# Altium PCB EMG-Arm-ELEC-V1.0.PcbDoc (part 1 of 5)
Units mil, origin at the board's own origin, x right, y up, seen from the top; angles counter-clockwise.
Board outline 8303.83 x 7532.25 mil, 2 copper layers (Top Layer, Bottom Layer), stack 3.556 mil thick; 303 components, 183 nets, 804 pads, 233 vias.
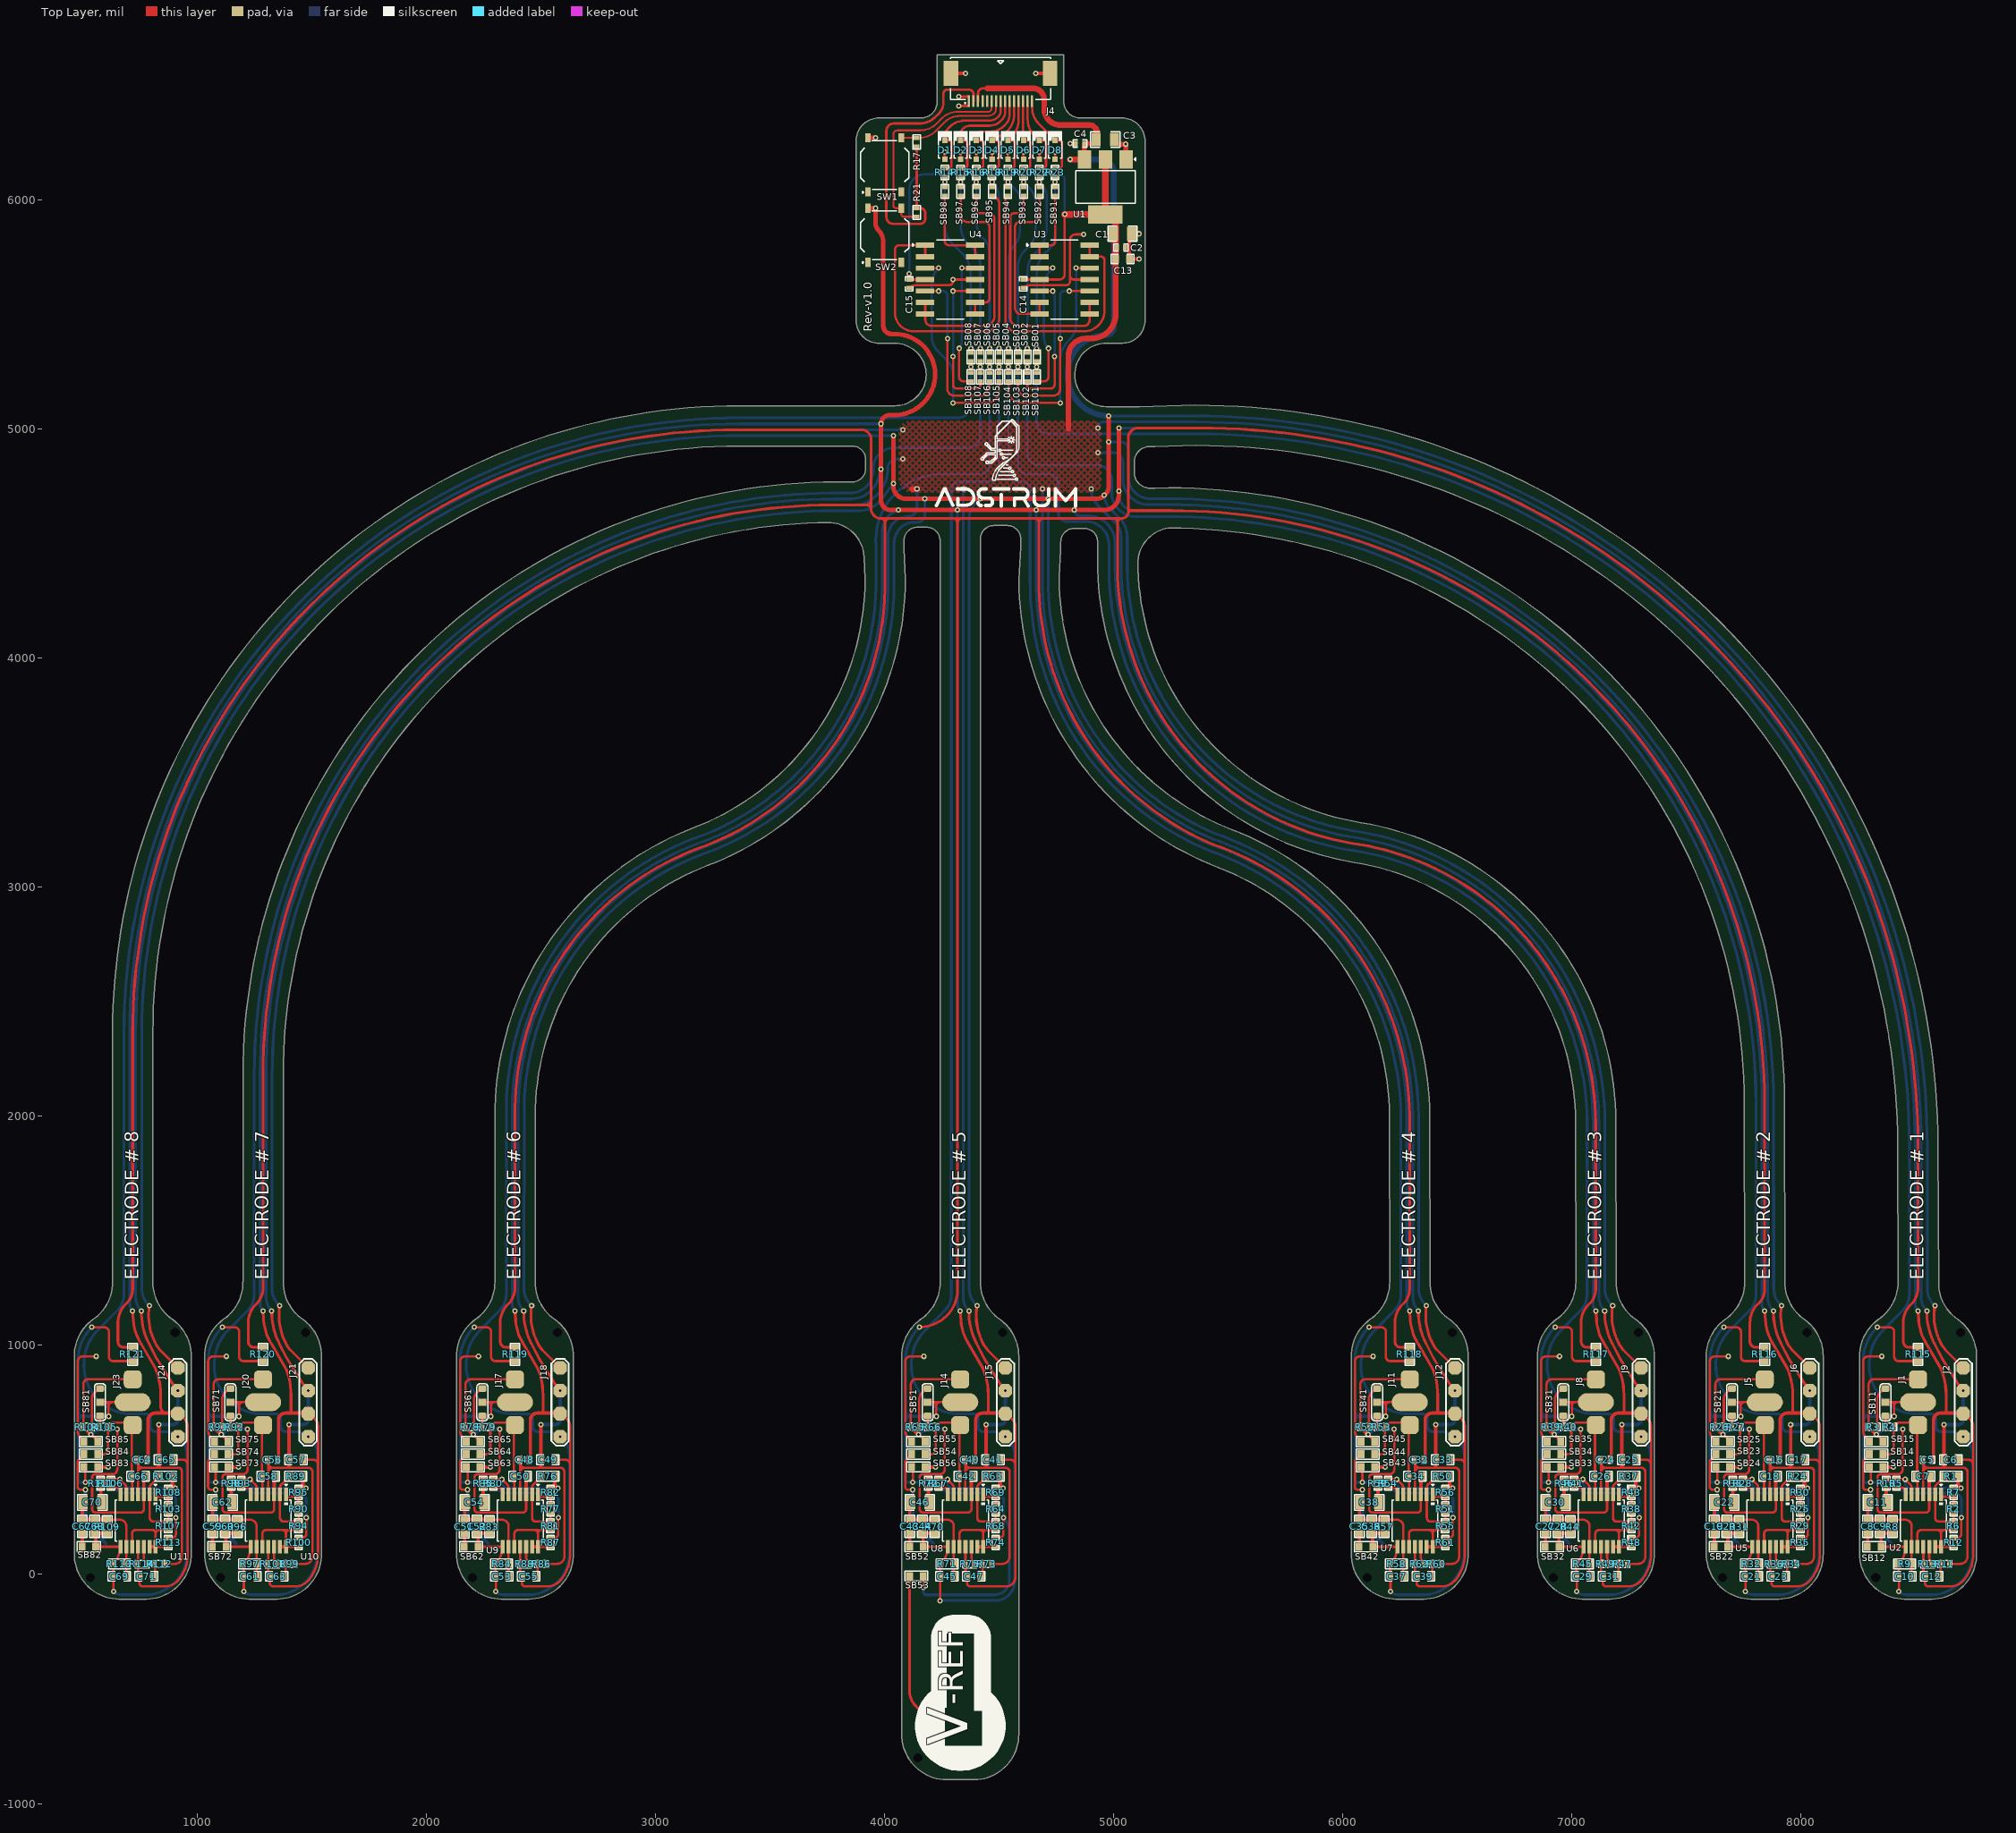
[diagram p0: Top Layer view]
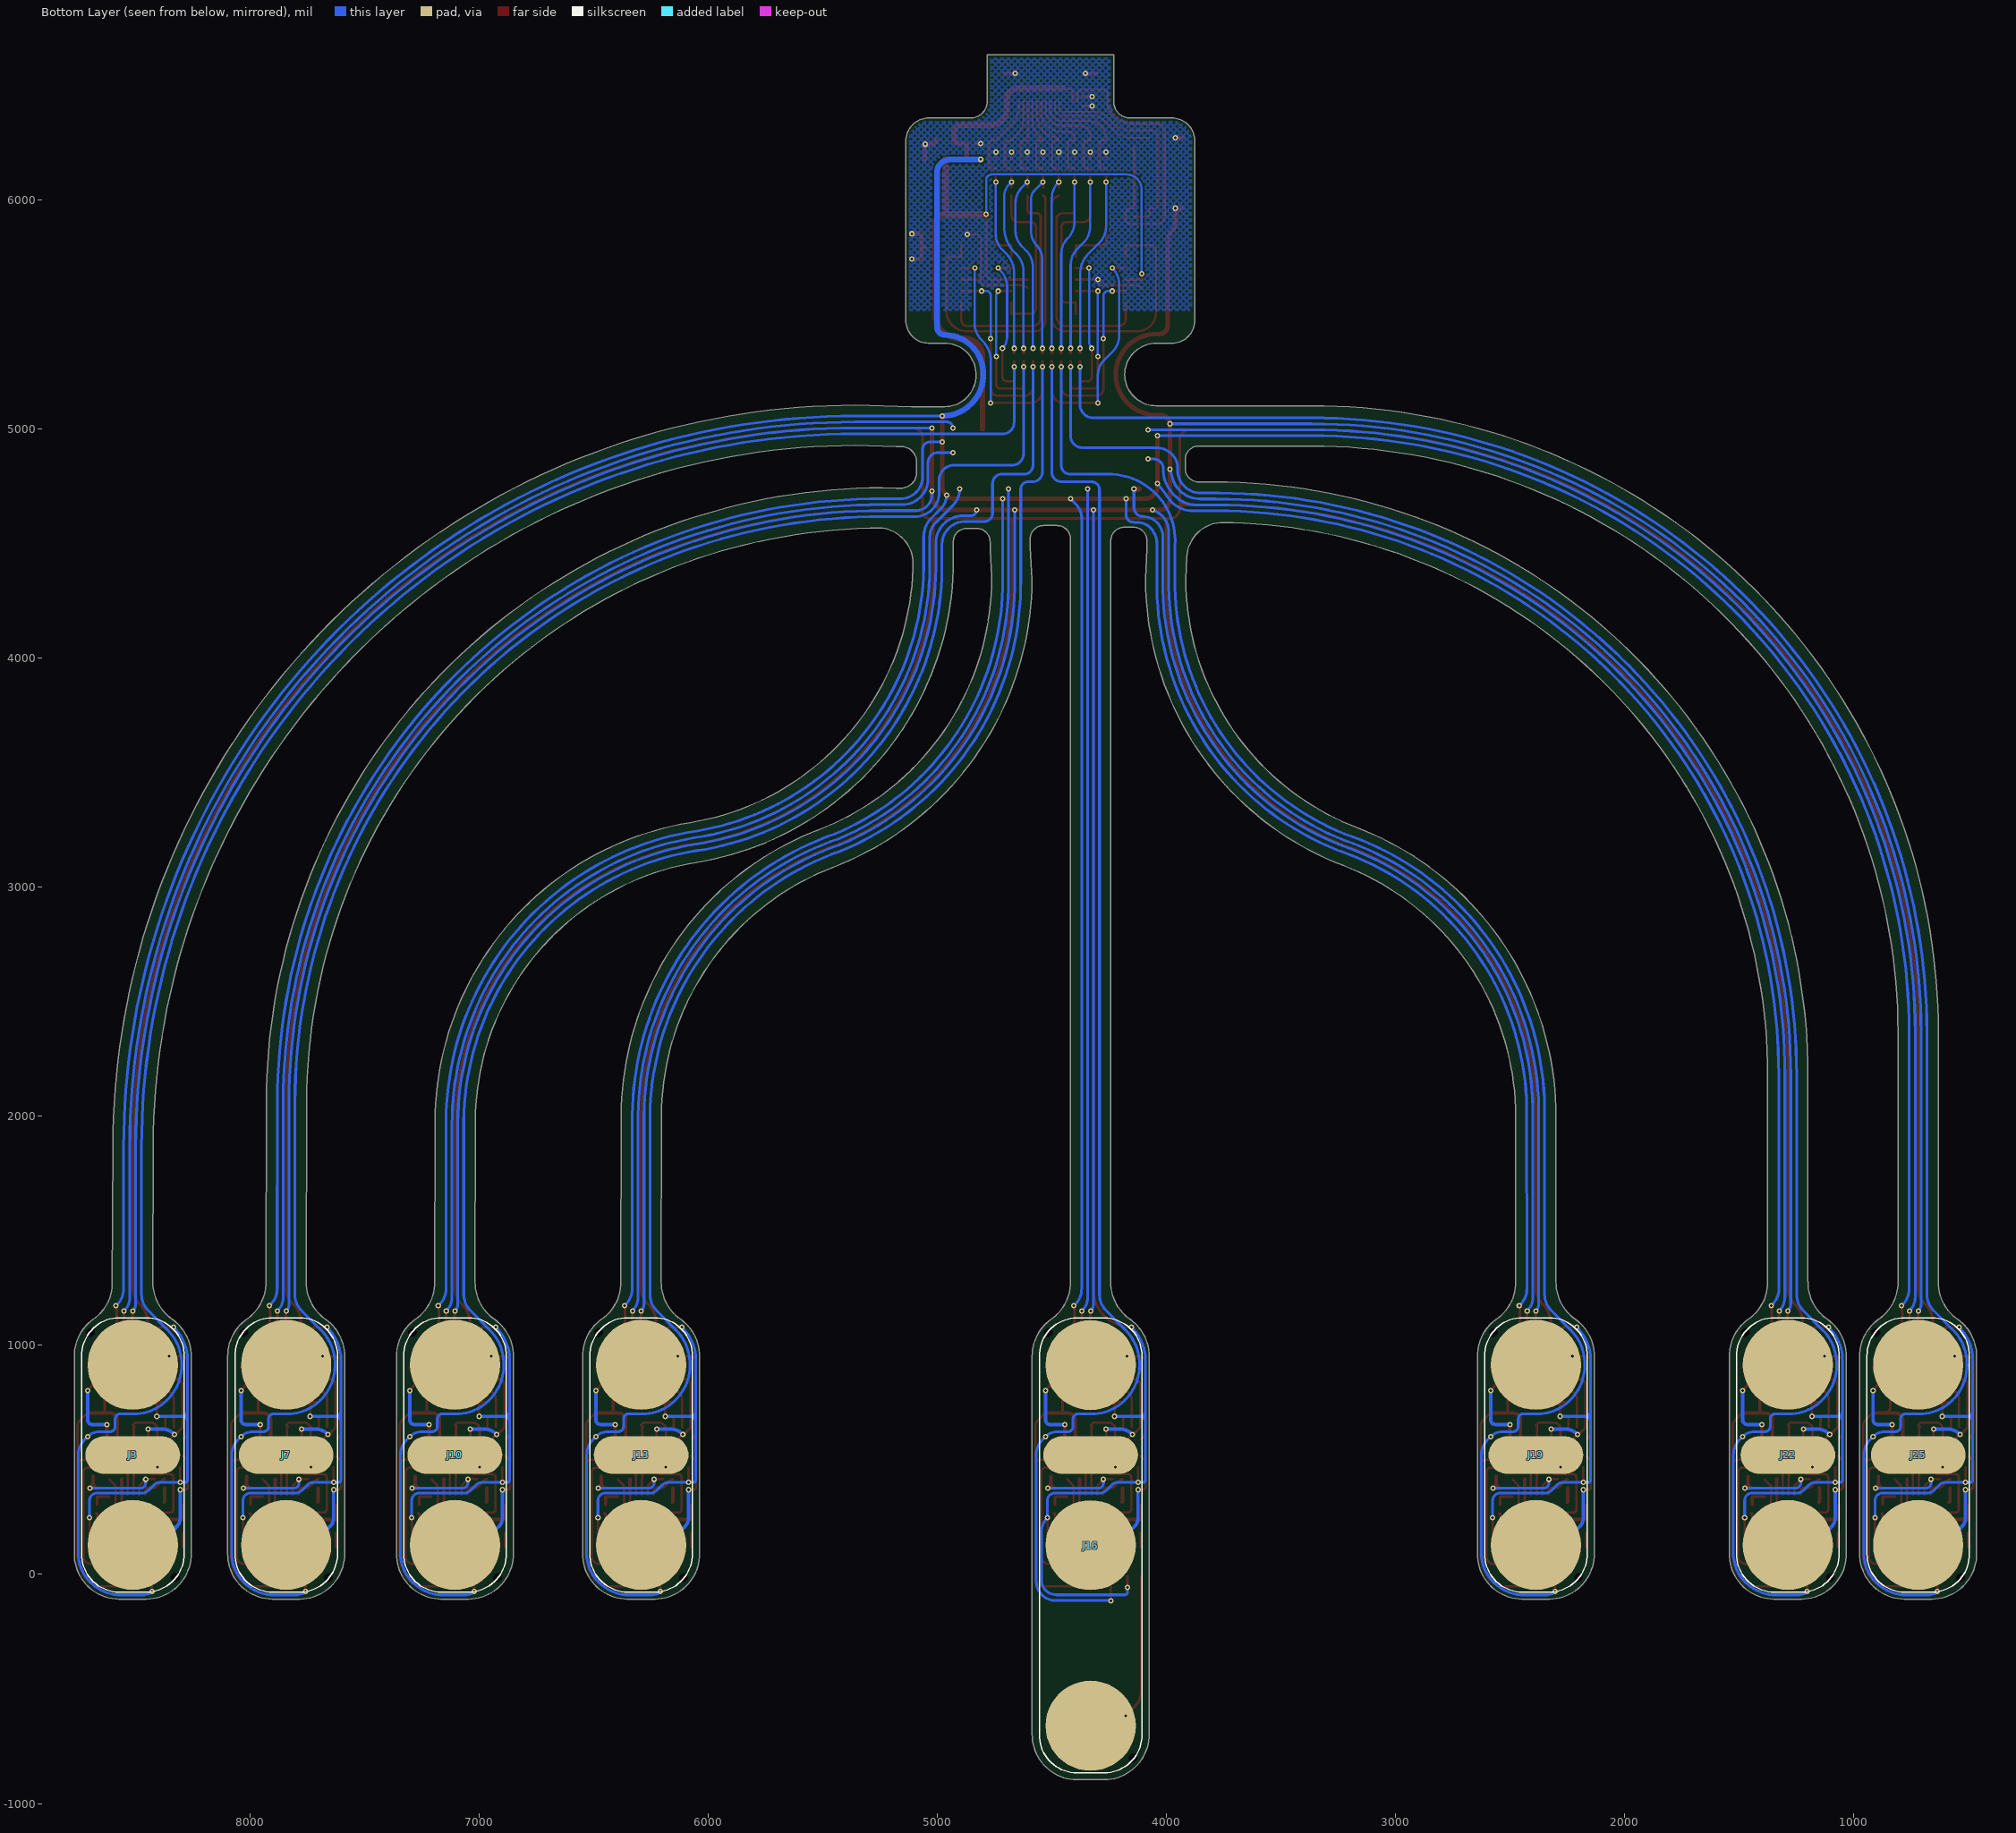
[diagram p1: Bottom Layer view, seen from below]
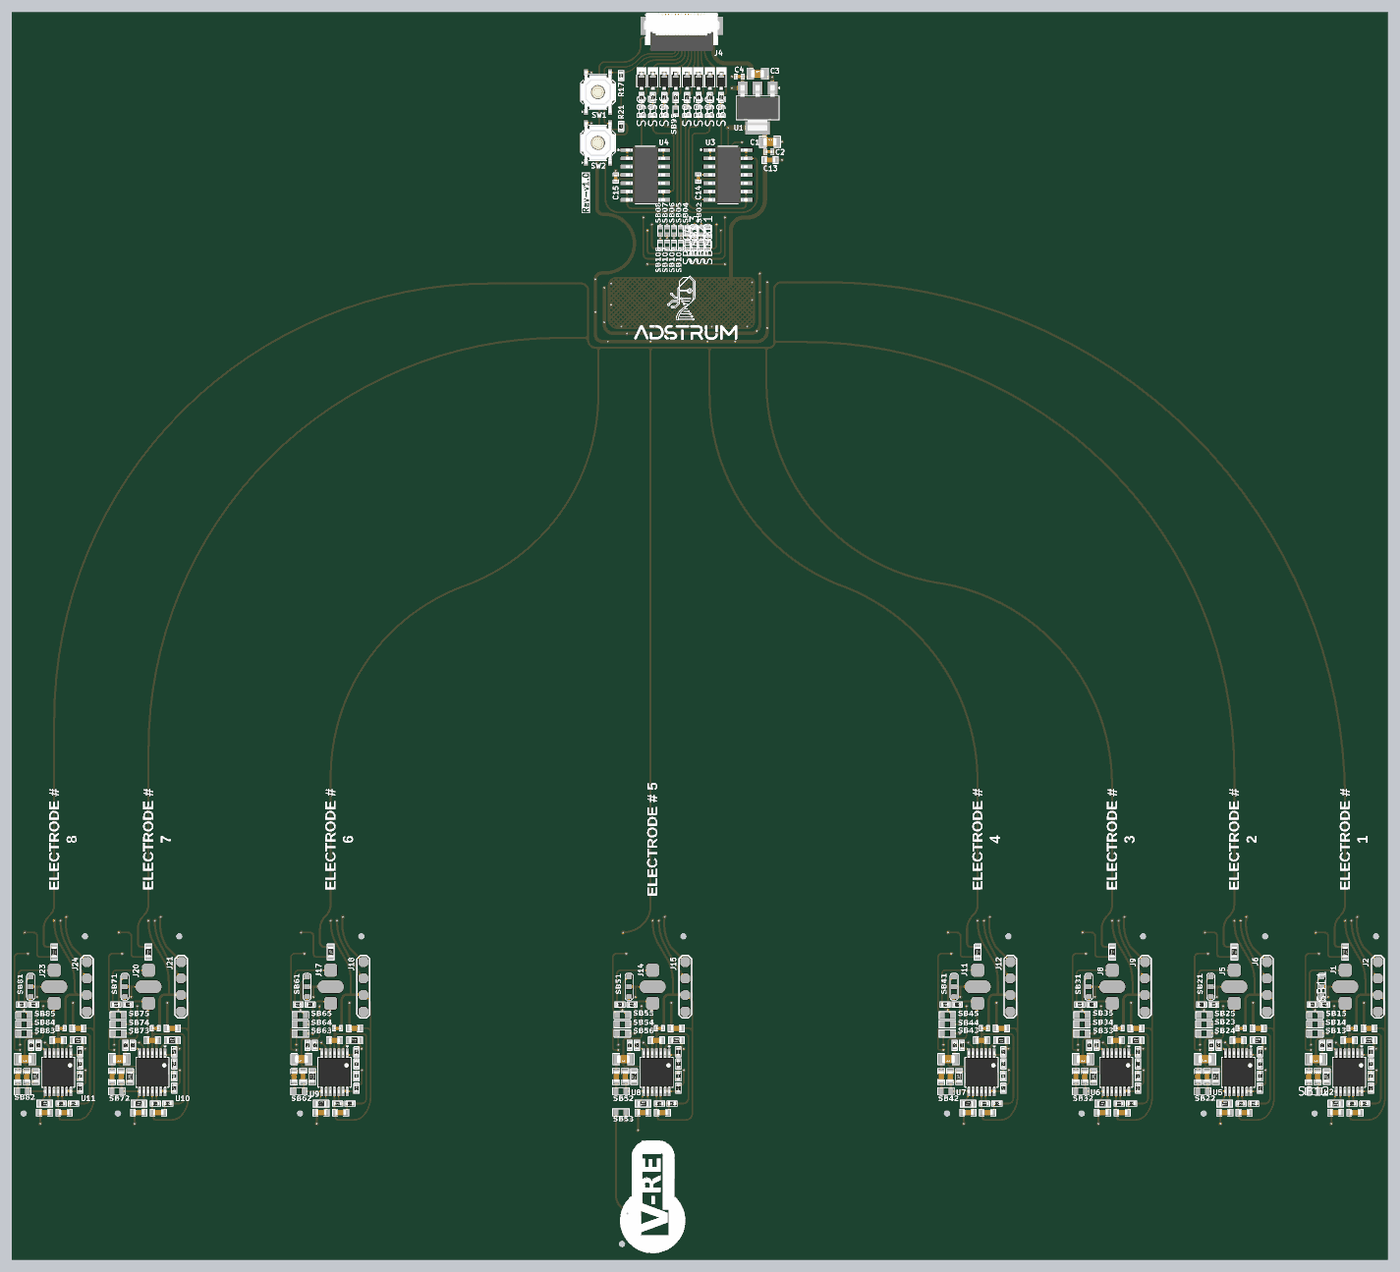
[diagram p5: 3D render of the assembled board from above, using the file's embedded part models]

## Layer stack, top to bottom
Top Solder: solder mask 0.5, Solder Resist, Dk 3.5
Top Layer: signal copper 1.378
Dielectric 1: dielectric 0.8, Flex, Dk 4.8
Bottom Layer: signal copper 1.378
Bottom Solder: solder mask 0.5, Solder Resist, Dk 3.5

## Board outline
464.62,91.21 ccw(c661.46,89) 659.25,-107.84 780.48,-107.84 ccw(c778.27,89) 975.11,91.21 975.11,951.68 ccw(c778.29,953.89) 893.31,1113.61 893.25,1113.53 cw(c1004.69,1275.78) 807.87,1277.99 807.86,1277.99 807.86,2365.78 cw(c3368.85,2365.78) 3368.91,4926.78 3859.83,4926.78 cw(c3859.83,4867.72) 3918.88,4867.72 3918.88,4828.88 cw(c3859.83,4828.88) 3859.83,4769.82 3790.1,4769.82 ccw(c3790.14,2180.53) 1200.85,2180.53 1200.85,1277.99 1200.84,1277.99 cw(c1004.02,1275.78) 1115.46,1113.53 1115.4,1113.61 ccw(c1230.42,953.89) 1033.6,951.68 1033.6,91.22 ccw(c1230.44,89) 1228.22,-107.84 1349.46,-107.84 ccw(c1347.25,89) 1544.08,91.21 1544.08,951.68 ccw(c1347.27,953.89) 1462.28,1113.61 1462.22,1113.53 cw(c1573.66,1275.78) 1376.85,1277.99 1376.83,1277.99 1376.83,2180.53 cw(c3790.14,2180.53) 3663.16,4590.5 cw(c3769.36,2180.66) 3754.11,4592.79 cw(c3755.11,4435.31) 3912.46,4441.73 3916.38,4345.67 cw(c2750.29,4348.85) 3167.55,3259.97 ccw(c3650.64,1999.36) 2300.63,1999.39 2300.63,1277.99 2300.62,1277.99 cw(c2103.81,1275.78) 2215.24,1113.53 2215.19,1113.61 ccw(c2330.2,953.89) 2133.39,951.68 2133.38,91.22 ccw(c2330.22,89) 2328.01,-107.84 2449.24,-107.84 ccw(c2447.03,89) 2643.87,91.21 2643.87,951.68 ccw(c2447.05,953.89) 2562.07,1113.61 2562.01,1113.53 cw(c2673.45,1275.78) 2476.63,1277.99 2476.62,1277.99 2476.62,1999.39 cw(c3650.64,1999.36) 3230.52,3095.64 ccw(c2750.29,4348.85) 4092.37,4347.38 4092.37,4349.13 4087.16,4476.72 4086.75,4520.34 cw(c4145.38,4513.3) 4145.38,4572.36 4184.79,4572.36 cw(c4184.79,4513.3) 4243.42,4520.34 4243.84,4518.77 4243.84,4513.77 4243.84,4513.3 4243.84,4497.77 4244.11,1277.99 cw(c4047.29,1275.78) 4158.73,1113.53 4158.67,1113.61 ccw(c4273.69,953.89) 4076.87,951.68 4076.86,-697.2 ccw(c4273.7,-699.41) 4271.49,-896.25 4392.72,-896.25 ccw(c4390.51,-699.41) 4587.35,-697.2 4587.35,951.68 ccw(c4390.53,953.89) 4505.55,1113.61 4505.48,1113.55 cw(c4616.91,1275.77) 4420.12,1277.98 4419.83,4484.12 4419.83,4523.81 4420.25,4527.75 cw(c4478.88,4520.7) 4478.88,4579.76 4536.84,4579.76 cw(c4536.84,4520.7) 4595.47,4527.74 4595.14,4484.12 4587.35,4344.23 4587.38,4341.23 ccw(c5944.31,4353.57) 5457.07,3087.07 5457.18,3087.02 cw(c5040.44,1999.57) 6205.01,2001.55 6206.27,1277.99 cw(c6009.45,1275.78) 6120.89,1113.53 6120.84,1113.61 ccw(c6235.85,953.89) 6039.03,951.68 6039.03,91.22 ccw(c6235.87,89) 6233.65,-107.84 6354.89,-107.84 ccw(c6352.68,89) 6549.52,91.21 6549.51,951.68 ccw(c6352.7,953.89) 6467.71,1113.61 6467.66,1113.53 cw(c6579.1,1275.78) 6382.28,1277.99 6382.25,1277.99 6381,2001.86 ccw(c5040.44,1999.57) 5520.16,3251.36 cw(c5944.31,4353.57) 4784.94,4128.55 cw(c5953.23,4349.04) 4764.31,4349.04 4764.34,4357.47 4770.72,4471.86 4770.72,4508.21 cw(c4829.77,4508.21) 4829.77,4567.26 4872.71,4567.26 cw(c4872.71,4508.21) 4931.77,4508.21 4931.77,4464.59 4931.67,4464.59 4931.14,4427.21 ccw(c6267.58,4427.72) 6052.87,3108.64 cw(c5868.16,1973.98) 7017.76,1975.99 7018.98,1277.98 cw(c6822.17,1275.77) 6933.61,1113.53 6933.55,1113.61 ccw(c7048.56,953.88) 6851.75,951.67 6851.74,91.21 ccw(c7048.58,89) 7046.37,-107.84 7167.6,-107.84 ccw(c7165.39,89) 7362.23,91.21 7362.23,951.67 ccw(c7165.41,953.88) 7280.43,1113.61 7280.37,1113.53 cw(c7391.81,1275.77) 7194.99,1277.98 7194.97,1277.99 7193.75,1976.3 ccw(c5868.16,1973.98) 6081.14,3282.34 cw(c6267.58,4427.71) 5107.13,4427.28 cw(c5263.95,4412.84) 5240.62,4568.58 cw(c5241.16,2055.39) 7754.35,2059.83 7755.73,1277.99 cw(c7558.92,1275.78) 7670.36,1113.53 7670.3,1113.62 ccw(c7785.31,953.89) 7588.5,951.68 7588.49,91.22 ccw(c7785.33,89) 7783.12,-107.83 7904.35,-107.83 ccw(c7902.14,89) 8098.98,91.22 8098.98,951.68 ccw(c7902.16,953.89) 8017.18,1113.61 8017.12,1113.53 cw(c8128.56,1275.78) 7931.74,1277.99 7931.72,1278 7930.33,2060.14 ccw(c5241.16,2055.39) 5240.58,4744.56 5240.58,4744.58 5181.92,4743.62 5153.55,4743.62 cw(c5159.64,4811.67) 5091.32,4811.67 5091.32,4856.61 cw(c5159.64,4856.61) 5153.72,4924.67 5181.92,4924.67 5359.84,4929.21 cw(c5359.53,1864.57) 8424.17,1869.92 8425.21,1277.99 cw(c8228.39,1275.78) 8339.83,1113.53 8339.77,1113.61 ccw(c8454.79,953.89) 8257.97,951.68 8257.97,91.22 ccw(c8454.8,89) 8452.59,-107.84 8573.83,-107.84 ccw(c8571.61,89) 8768.45,91.21 8768.2,953.15 8768.45,951.67 ccw(c8571.63,953.89) 8686.65,1113.61 8686.36,1113.69 cw(c8795.91,1273.18) 8602.52,1267.22 8600.16,1870.23 ccw(c5359.53,1864.57) 5358.63,5105.2 5357.58,5105.2 5112.91,5098.96 4968.84,5098.96 cw(c4968.84,5235.08) 4832.72,5235.08 cw(c4968.75,5239.99) 4968.75,5376.11 5040.41,5376.11 ccw(c5040.41,5473.3) 5109.14,5404.57 ccw(c5038.46,5475.25) 5138.41,5475.25 5138.41,6259.23 ccw(c5038.37,6259.23) 5109.11,6329.98 ccw(c5038.43,6259.3) 5038.43,6359.25 4855.71,6359.25 cw(c4855.71,6430.77) 4784.2,6430.77 4784.2,6636 4231.52,6636 4231.52,6430.77 cw(c4160.01,6430.77) 4160.01,6359.25 3977.29,6359.25 ccw(c3977.29,6259.3) 3906.61,6329.98 ccw(c3977.36,6259.23) 3877.31,6259.23 3877.31,5475.25 ccw(c3977.26,5475.25) 3906.58,5404.57 ccw(c3977.98,5475.97) 3977.98,5375 4046.88,5375 cw(c4046.88,5238.88) 4183,5238.88 cw(c4046.88,5238.88) 4046.88,5102.76 3368.91,5102.76 ccw(c3368.85,2365.78) 631.87,2365.78 631.87,1277.99 631.86,1277.99 cw(c435.05,1275.78) 546.48,1113.53 546.43,1113.61 ccw(c661.44,953.89) 464.63,951.68

## Design rules (kind name [scope] priority, off if disabled: settings)
BoardOutlineClearance [All] p1: gap=0 ignorepadtopadclearanceinfootprint=FALSE except(10: Arc-OutlineEdge Track-OutlineEdge SMDPad-OutlineEdge THPad-OutlineEdge Via-OutlineEdge Fill-OutlineEdge Poly-OutlineEdge Region-OutlineEdge)
Clearance [All] p1: gap=7 ignorepadtopadclearanceinfootprint=TRUE
ComponentClearance [All] p1: gap=0 collisioncheckmode=3 verticalgap=0 showdistances=FALSE
MinimumSolderMaskSliver [All] p1: minsoldermaskwidth=0
PlaneConnect [All] p1: planeconnectstyle=Direct reliefexpansion=20 reliefentries=4 reliefconductorwidth=10 reliefairgap=10
PolygonConnect [All] p1: connectstyle=Direct reliefconductorwidth=10 reliefentries=4 polygonreliefangle="90 Angle" airgapwidth=10
RoutingVias [All] p1: holewidth=11.81 width=23.62 viastyle="Through Hole" minholewidth=7.87 minwidth=13.78 maxholewidth=31.5 maxwidth=62.99
SilkToSilkClearance [All] p1: silktosilkclearance=0
SilkToSolderMaskClearance [IsPad] p1: minsilkscreentomaskgap=0 clearancetoexposedcopper=TRUE
SolderMaskExpansion Via [IsVia] p1: expansion=4 istentingtop=TRUE
SolderMaskExpansion [All] p2: expansion=4 istentingtop=FALSE
SupplyNets "Schematic Supply Nets_1" [InNet('VBAT')] p1: voltage=0.000
SupplyNets "Schematic Supply Nets" [InNet('5V')] p2: voltage=0.000
SupplyNets "Schematic Supply Nets_19" [InNet('GND')] p3: voltage=0.000
SupplyNets "Schematic Supply Nets_13" [InNet('VCC_3V3')] p4: voltage=0.000
Width [All] p1: maxlimit=50 minlimit=8 preferedwidth=15 minimp=50.000000 maximp=50.000000 favimp=50.000000
25 further rules are at their usual default settings.

## Classes and differential pairs
component class U_Power-Sheet: C1 C2 C3 C4 U1
component class U_Opamp-Sheet2: C13 C14 C15 SB01 SB02 SB03 SB04 SB05 SB06 SB07 SB08 SB91 SB92 SB93 SB94 SB95 SB96 SB97 SB98 SB101 SB102 SB103 SB104 SB105 SB106 SB107 SB108 U3 U4
component class U_Electrode-Sheet8: C64 C65 C66 C67 C68 C69 C70 C71 J23 J24 J25 R102 R103 R104 R105 R106 R107 R108 R109 R110 R111 R112 R113 R114 R121 SB81 SB82 SB83 SB84 SB85 U11
component class U_Electrode-Sheet7: C56 C57 C58 C59 C60 C61 C62 C63 J20 J21 J22 R89 R90 R91 R92 R93 R94 R95 R96 R97 R98 R99 R100 R101 R120 SB71 SB72 SB73 SB74 SB75 U10
component class U_Electrode-Sheet6: C48 C49 C50 C51 C52 C53 C54 C55 J17 J18 J19 R76 R77 R78 R79 R80 R81 R82 R83 R84 R85 R86 R87 R88 R119 SB61 SB62 SB63 SB64 SB65 U9
component class U_Electrode-Sheet5: C40 C41 C42 C43 C44 C45 C46 C47 J14 J15 J16 R63 R64 R65 R66 R67 R68 R69 R70 R71 R72 R73 R74 R75 SB51 SB52 SB53 SB54 SB55 SB56 U8
component class U_Electrode-Sheet4: C32 C33 C34 C35 C36 C37 C38 C39 J11 J12 J13 R50 R51 R52 R53 R54 R55 R56 R57 R58 R59 R60 R61 R62 R118 SB41 SB42 SB43 SB44 SB45 U7
component class U_Electrode-Sheet3: C24 C25 C26 C27 C28 C29 C30 C31 J8 J9 J10 R37 R38 R39 R40 R41 R42 R43 R44 R45 R46 R47 R48 R49 R117 SB31 SB32 SB33 SB34 SB35 U6
component class U_Electrode-Sheet2: C16 C17 C18 C19 C20 C21 C22 C23 J5 J6 J7 R24 R25 R26 R27 R28 R29 R30 R31 R32 R33 R34 R35 R36 R116 SB21 SB22 SB23 SB24 SB25 U5
component class U_Electrode-Sheet1: C5 C6 C7 C8 C9 C10 C11 C12 J1 J2 J3 R1 R2 R3 R4 R5 R6 R7 R8 R9 R10 R11 R12 R13 R115 SB11 SB12 SB13 SB14 SB15 U2
component class U_Connector-Sheet: D1 D2 D3 D4 D5 D6 D7 D8 J4 R14 R15 R16 R17 R18 R19 R20 R21 R22 R23 SW1 SW2

## Components (designator, comment, footprint, x,y, rotation, side; value= is the part's Value field where it differs from the comment)
C1 "4.7uF" Cap-0805 5040.25,5853.82 r0 top
C2 "100nF" cap-0402 5033.25,5793.82 r180 top
C3 "4.7uF" Cap-0805 4965.45,6264.88 r0 top
C4 "100nF" cap-0402 4854.86,6247.05 r0 top
C5 "100nF" cap-0402 8554,501.22 r180 top
C6 "4.7uF" Cap-0603 8656.43,501.22 r180 top
C7 "2.2nF" Cap-0603 8536,428.22 r180 top
C8 "47nF" Cap-0603 8293.04,209.87 r270 top
C9 "47nF" Cap-0603 8347.04,209.87 r270 top
C10 "DNP" Cap-0603 8454.82,-8 r0 top
C11 "47uF" Cap-0805 8336.71,315.12 r180 top
C12 "220nF" Cap-0603 8572.49,-8 r0 top
C13 "10uF" Cap-0603 5040.26,5743.82 r0 top
C14 "0.1uF" Cap-0402 4607.02,5635.32 r270 top
C15 "0.1uF" Cap-0402 4108.98,5635.32 r270 top
C16 "100nF" cap-0402 7884.52,501.23 r180 top
C17 "4.7uF" Cap-0603 7986.96,501.23 r180 top
C18 "2.2nF" Cap-0603 7866.52,428.23 r180 top
C19 "47nF" Cap-0603 7623.56,209.88 r270 top
C20 "47nF" Cap-0603 7677.56,209.88 r270 top
C21 "DNP" Cap-0603 7785.34,-8 r0 top
C22 "47uF" Cap-0805 7667.24,315.12 r180 top
C23 "220nF" Cap-0603 7903.01,-8 r0 top
C24 "100nF" cap-0402 7147.78,501.22 r180 top
C25 "4.7uF" Cap-0603 7250.21,501.22 r180 top
C26 "2.2nF" Cap-0603 7129.78,428.22 r180 top
C27 "47nF" Cap-0603 6886.81,209.87 r270 top
C28 "47nF" Cap-0603 6941.04,209.87 r270 top
C29 "DNP" Cap-0603 7048.59,-8.01 r0 top
C30 "47uF" Cap-0805 6930.49,315.12 r180 top
C31 "220nF" Cap-0603 7166.27,-8.01 r0 top
C32 "100nF" cap-0402 6335.06,501.23 r180 top
C33 "4.7uF" Cap-0603 6437.49,501.23 r180 top
C34 "2.2nF" Cap-0603 6317.06,428.23 r180 top
C35 "47nF" Cap-0603 6074.1,209.88 r270 top
C36 "47nF" Cap-0603 6128.1,209.88 r270 top
C37 "DNP" Cap-0603 6235.88,-8 r0 top
C38 "47uF" Cap-0805 6117.78,315.12 r180 top
C39 "220nF" Cap-0603 6353.55,-8 r0 top
C40 "100nF" cap-0402 4372.9,501.23 r180 top
C41 "4.7uF" Cap-0603 4474.75,501.23 r180 top
C42 "2.2nF" Cap-0603 4354.9,428.23 r180 top
C43 "47nF" Cap-0603 4111.94,209.88 r270 top
C44 "47nF" Cap-0603 4165.94,209.88 r270 top
C45 "DNP" Cap-0603 4273.72,-8 r0 top
C46 "47uF" Cap-0805 4155.61,315.12 r180 top
C47 "220nF" Cap-0603 4391.39,-8 r0 top
C48 "100nF" cap-0402 2429.41,501.23 r180 top
C49 "4.7uF" Cap-0603 2531.85,501.23 r180 top
C50 "2.2nF" Cap-0603 2411.41,428.23 r180 top
C51 "47nF" Cap-0603 2166.96,208.88 r270 top
C52 "47nF" Cap-0603 2222.45,209.88 r270 top
C53 "DNP" Cap-0603 2330.23,-8 r0 top
C54 "47uF" Cap-0805 2212.13,315.12 r180 top
C55 "220nF" Cap-0603 2447.9,-8 r0 top
C56 "100nF" cap-0402 1329.63,501.23 r180 top
C57 "4.7uF" Cap-0603 1432.06,501.23 r180 top
C58 "2.2nF" Cap-0603 1311.63,428.23 r180 top
C59 "47nF" Cap-0603 1068.67,209.88 r270 top
C60 "47nF" Cap-0603 1122.67,209.88 r270 top
C61 "DNP" Cap-0603 1230.45,-8 r0 top
C62 "47uF" Cap-0805 1112.35,315.12 r180 top
C63 "220nF" Cap-0603 1348.12,-8 r0 top
C64 "100nF" cap-0402 760.65,501.23 r180 top
C65 "4.7uF" Cap-0603 863.09,501.23 r180 top
C66 "2.2nF" Cap-0603 742.65,428.23 r180 top
C67 "47nF" Cap-0603 499.69,209.88 r270 top
C68 "47nF" Cap-0603 553.69,209.88 r270 top
C69 "DNP" Cap-0603 661.47,-8 r0 top
C70 "47uF" Cap-0805 543.37,315.12 r180 top
C71 "220nF" Cap-0603 779.14,-8 r0 top
D1 "MM3Z3V3B" SOD323F 4264.84,6219.66 r90 top
D2 "MM3Z3V3B" SOD323F 4333.58,6219.66 r90 top
D3 "MM3Z3V3B" SOD323F 4402.32,6219.66 r90 top
D4 "MM3Z3V3B" SOD323F 4471.06,6219.66 r90 top
D5 "MM3Z3V3B" SOD323F 4539.8,6219.66 r90 top
D6 "MM3Z3V3B" SOD323F 4608.54,6219.66 r90 top
D7 "MM3Z3V3B" SOD323F 4677.28,6219.66 r90 top
D8 "MM3Z3V3B" SOD323F 4746.02,6219.66 r90 top
J1 "Test Pad SMD 3 Pin" "Test Pad (SMD 3 Pin)" 8512.96,751.97 r180 top
J2 "4 Pin SMD Wire Connector" "4 Pin SMD Wire CON." 8710,602 r90 top
J3 "SEMG PAD" SEMG-PAD 8512.96,521.95 r180 bottom locked
J4 "8.01A0.015200" 8.01A0.015200 4507.86,6492.95 r180 top
J5 "Test Pad SMD 3 Pin" "Test Pad (SMD 3 Pin)" 7843.49,751.97 r180 top
J6 "4 Pin SMD Wire Connector" "4 Pin SMD Wire CON." 8040.53,602 r90 top
J7 "SEMG PAD" SEMG-PAD 7843.49,521.95 r180 bottom locked
J8 "Test Pad SMD 3 Pin" "Test Pad (SMD 3 Pin)" 7106.74,751.96 r180 top
J9 "4 Pin SMD Wire Connector" "4 Pin SMD Wire CON." 7303.78,601.99 r90 top
J10 "SEMG PAD" SEMG-PAD 7106.74,521.94 r180 bottom locked
J11 "Test Pad SMD 3 Pin" "Test Pad (SMD 3 Pin)" 6294.03,751.97 r180 top
J12 "4 Pin SMD Wire Connector" "4 Pin SMD Wire CON." 6491.06,602 r90 top
J13 "SEMG PAD" SEMG-PAD 6294.03,521.95 r180 bottom locked
J14 "Test Pad SMD 3 Pin" "Test Pad (SMD 3 Pin)" 4331.86,751.97 r180 top
J15 "4 Pin SMD Wire Connector" "4 Pin SMD Wire CON." 4528.9,602 r90 top
J16 "EMG ELECTRODE 4 pin" "EMG ELECTRODE 4 pin" 4331.86,127.75 r0 bottom locked
J17 "Test Pad SMD 3 Pin" "Test Pad (SMD 3 Pin)" 2388.38,751.97 r180 top
J18 "4 Pin SMD Wire Connector" "4 Pin SMD Wire CON." 2585.41,602 r90 top
J19 "SEMG PAD" SEMG-PAD 2388.38,521.95 r180 bottom locked
J20 "Test Pad SMD 3 Pin" "Test Pad (SMD 3 Pin)" 1288.59,751.97 r180 top
J21 "4 Pin SMD Wire Connector" "4 Pin SMD Wire CON." 1485.63,602 r90 top
J22 "SEMG PAD" SEMG-PAD 1288.59,521.95 r180 bottom locked
J23 "Test Pad SMD 3 Pin" "Test Pad (SMD 3 Pin)" 719.62,751.97 r180 top
J24 "4 Pin SMD Wire Connector" "4 Pin SMD Wire CON." 916.65,602 r90 top
J25 "SEMG PAD" SEMG-PAD 719.62,521.95 r180 bottom locked
R1 "DNP" Res-0603 8656.43,428.22 r0 top
R2 "1K" Res-0402 8668.35,285.69 r90 top
R3 "1M" Res-0402 8316.06,644.29 r0 top value=1MR
R4 "1M" Res-0402 8389.02,644.29 r0 top value=1MR
R5 "10K" Res-0402 8417.95,398.13 r90 top
R6 "10K" Res-0402 8668.35,212.64 r270 top
R7 "1K" Res-0402 8668.35,358.65 r90 top
R8 "1M" Res-0603 8401.04,208.87 r270 top
R9 "DNP" Res-0603 8454.82,46 r180 top
R10 "1K" Res-0402 8374.13,398.13 r270 top
R11 "10K" Res-0402 8629.57,46.32 r0 top
R12 "1K" Res-0402 8668.35,139.5 r90 top
R13 "10K" Res-0402 8554.5,46 r0 top
R14 "1K" Res-0402 4264.84,6121 r270 top
R15 "1K" Res-0402 4333.58,6121 r270 top
R16 "1K" Res-0402 4402.32,6121 r270 top
R17 "10K" Res-0402 4141.67,6253.68 r270 top
R18 "1K" Res-0402 4471.06,6121 r270 top
R19 "1K" Res-0402 4539.8,6121 r270 top
R20 "1K" Res-0402 4608.54,6121 r270 top
R21 "10K" Res-0402 4141.67,5946.68 r90 top
R22 "1K" Res-0402 4677.28,6121 r270 top
R23 "1K" Res-0402 4746.02,6121 r270 top
R24 "DNP" Res-0603 7986.96,428.23 r0 top
R25 "1K" Res-0402 7998.87,285.69 r90 top
R26 "1M" Res-0402 7646.59,644.3 r0 top value=1MR
R27 "1M" Res-0402 7719.54,644.3 r0 top value=1MR
R28 "10K" Res-0402 7748.47,398.13 r90 top
R29 "10K" Res-0402 7998.87,212.64 r270 top
R30 "1K" Res-0402 7998.87,358.65 r90 top
R31 "1M" Res-0603 7731.56,208.88 r270 top
R32 "DNP" Res-0603 7785.34,46 r180 top
R33 "1K" Res-0402 7704.65,398.13 r270 top
R34 "10K" Res-0402 7960.1,46.32 r0 top
R35 "1K" Res-0402 7998.87,139.5 r90 top
R36 "10K" Res-0402 7885.03,46 r0 top
R37 "DNP" Res-0603 7250.21,428.22 r0 top
R38 "1K" Res-0402 7262.12,285.68 r270 top
R39 "1M" Res-0402 6909.84,644.29 r0 top value=1MR
R40 "1M" Res-0402 6982.79,644.29 r0 top value=1MR
R41 "10K" Res-0402 7011.73,398.12 r270 top
R42 "10K" Res-0402 7262.12,212.64 r90 top
R43 "1K" Res-0402 7262.12,358.64 r270 top
R44 "1M" Res-0603 6994.8,208.87 r270 top
R45 "DNP" Res-0603 7048.59,45.99 r180 top
R46 "1K" Res-0402 6967.9,398.12 r90 top
R47 "10K" Res-0402 7223.35,46.31 r180 top
R48 "1K" Res-0402 7262.12,139.49 r270 top
R49 "10K" Res-0402 7148.28,45.99 r180 top
R50 "DNP" Res-0603 6437.49,428.23 r0 top
R51 "1K" Res-0402 6449.41,285.69 r90 top
R52 "1M" Res-0402 6097.12,644.29 r0 top value=1MR
R53 "1M" Res-0402 6170.08,644.29 r0 top value=1MR
R54 "10K" Res-0402 6199.01,398.13 r90 top
R55 "10K" Res-0402 6449.41,212.64 r270 top
R56 "1K" Res-0402 6449.41,358.65 r90 top
R57 "1M" Res-0603 6182.1,208.88 r270 top
R58 "DNP" Res-0603 6235.88,46 r180 top
R59 "1K" Res-0402 6155.19,398.13 r270 top
R60 "10K" Res-0402 6410.64,46.32 r180 top
R61 "1K" Res-0402 6449.41,139.5 r90 top
R62 "10K" Res-0402 6335.56,46 r180 top
R63 "DNP" Res-0603 4475.33,428.23 r0 top
R64 "1K" Res-0402 4487.25,285.69 r90 top
R65 "1M" Res-0402 4134.96,644.3 r0 top value=1MR
R66 "1M" Res-0402 4207.92,644.3 r0 top value=1MR
R67 "10K" Res-0402 4236.85,398.13 r90 top
R68 "10K" Res-0402 4487.25,212.64 r270 top
R69 "1K" Res-0402 4487.25,358.65 r90 top
R70 "1M" Res-0603 4219.94,208.88 r270 top
R71 "DNP" Res-0603 4274.23,46.01 r180 top
R72 "1K" Res-0402 4193.03,398.13 r270 top
R73 "10K" Res-0402 4448.47,46.32 r0 top
R74 "1K" Res-0402 4487.25,139.5 r90 top
R75 "10K" Res-0402 4373.4,46 r0 top
R76 "DNP" Res-0603 2531.85,428.23 r0 top
R77 "1K" Res-0402 2543.76,285.69 r90 top
R78 "1M" Res-0402 2191.48,644.29 r0 top value=1MR
R79 "1M" Res-0402 2264.43,644.29 r0 top value=1MR
R80 "10K" Res-0402 2293.36,398.13 r90 top
R81 "10K" Res-0402 2543.76,212.64 r270 top
R82 "1K" Res-0402 2543.76,358.65 r90 top
R83 "1M" Res-0603 2276.45,208.88 r270 top
R84 "DNP" Res-0603 2330.23,46 r180 top
R85 "1K" Res-0402 2249.54,398.13 r270 top
R86 "10K" Res-0402 2504.99,46.32 r0 top
R87 "1K" Res-0402 2543.76,139.5 r90 top
R88 "10K" Res-0402 2429.91,46 r0 top
R89 "DNP" Res-0603 1432.06,428.23 r0 top
R90 "1K" Res-0402 1443.98,285.69 r90 top
R91 "1M" Res-0402 1091.69,644.29 r0 top value=1MR
R92 "1M" Res-0402 1164.65,644.29 r0 top value=1MR
R93 "10K" Res-0402 1193.58,398.13 r90 top
R94 "10K" Res-0402 1443.98,212.64 r270 top
R95 "1K" Res-0402 1443.98,358.65 r90 top
R96 "1M" Res-0603 1176.67,208.88 r270 top
R97 "DNP" Res-0603 1230.45,46 r180 top
R98 "1K" Res-0402 1149.76,398.13 r270 top
R99 "10K" Res-0402 1405.21,46.32 r0 top
R100 "1K" Res-0402 1443.98,139.5 r90 top
R101 "10K" Res-0402 1330.13,46 r0 top
R102 "DNP" Res-0603 863.09,428.23 r0 top
R103 "1K" Res-0402 875,285.69 r90 top
R104 "1M" Res-0402 522.72,644.29 r0 top value=1MR
R105 "1M" Res-0402 595.67,644.29 r0 top value=1MR
R106 "10K" Res-0402 624.6,398.13 r90 top
R107 "10K" Res-0402 875,212.64 r270 top
R108 "1K" Res-0402 875,358.65 r90 top
R109 "1M" Res-0603 607.69,208.88 r270 top
R110 "DNP" Res-0603 661.47,46 r180 top
R111 "1K" Res-0402 580.78,398.13 r270 top
R112 "10K" Res-0402 836.23,46.32 r0 top
R113 "1K" Res-0402 875,139.5 r90 top
R114 "10K" Res-0402 761.15,46 r0 top
R115 "0R" Res-0603 8512.96,961.53 r90 top
R116 "0R" Res-0603 7843.49,961.53 r90 top
R117 "0R" Res-0603 7106.74,961.52 r90 top
R118 "0R" Res-0603 6294.03,961.53 r90 top
R119 "0R" Res-0603 2388.38,961.53 r90 top
R120 "0R" Res-0603 1288.59,961.53 r90 top
R121 "0R" Res-0603 719.62,961.53 r90 top
SB01 "Solder Bridge 0402" "Solder Bridge 0402" 4666.06,5315.85 r90 top
SB02 "Solder Bridge 0402" "Solder Bridge 0402" 4624.92,5315.85 r90 top
SB03 "Solder Bridge 0402" "Solder Bridge 0402" 4583.78,5315.85 r90 top
SB04 "Solder Bridge 0402" "Solder Bridge 0402" 4542.64,5315.85 r90 top
SB05 "Solder Bridge 0402" "Solder Bridge 0402" 4501.49,5315.85 r90 top
SB06 "Solder Bridge 0402" "Solder Bridge 0402" 4460.35,5315.85 r90 top
SB07 "Solder Bridge 0402" "Solder Bridge 0402" 4419.21,5315.85 r90 top
SB08 "Solder Bridge 0402" "Solder Bridge 0402" 4378.06,5315.85 r90 top
SB11 "Solder Bridge 3 Pin" "Solder Bridge 3 Pin" 8370.52,751.97 r270 top
SB12 "Solder Bridge 0603" "Solder Bridge" 8321.55,121 r0 top
SB13 "Solder Bridge 0603" "Solder Bridge" 8330,469.64 r180 top
SB14 "Solder Bridge 0603" "Solder Bridge" 8330,525 r0 top
SB15 "Solder Bridge 0603" "Solder Bridge" 8330,580 r0 top
SB21 "Solder Bridge 3 Pin" "Solder Bridge 3 Pin" 7701.04,751.97 r270 top
SB22 "Solder Bridge 0603" "Solder Bridge" 7652.07,121 r0 top
SB23 "Solder Bridge 0603" "Solder Bridge" 7660.53,469.64 r180 top
SB24 "Solder Bridge 0603" "Solder Bridge" 7660.53,525 r0 top
SB25 "Solder Bridge 0603" "Solder Bridge" 7660.53,580 r0 top
SB31 "Solder Bridge 3 Pin" "Solder Bridge 3 Pin" 6964.29,751.96 r270 top
SB32 "Solder Bridge 0603" "Solder Bridge" 6915.32,121 r0 top
SB33 "Solder Bridge 0603" "Solder Bridge" 6923.78,469.64 r180 top
SB34 "Solder Bridge 0603" "Solder Bridge" 6923.78,524.99 r0 top
SB35 "Solder Bridge 0603" "Solder Bridge" 6923.78,579.99 r0 top
SB41 "Solder Bridge 3 Pin" "Solder Bridge 3 Pin" 6151.58,751.97 r270 top
SB42 "Solder Bridge 0603" "Solder Bridge" 6102.61,121 r0 top
SB43 "Solder Bridge 0603" "Solder Bridge" 6111.06,469.64 r180 top
SB44 "Solder Bridge 0603" "Solder Bridge" 6111.06,525 r0 top
SB45 "Solder Bridge 0603" "Solder Bridge" 6111.06,580 r0 top
SB51 "Solder Bridge 3 Pin" "Solder Bridge 3 Pin" 4189.42,751.97 r270 top
SB52 "Solder Bridge 0603" "Solder Bridge" 4140.45,121 r0 top
SB53 "Solder Bridge 0603" "Solder Bridge" 4140.45,-7.18 r0 top
SB54 "Solder Bridge 0603" "Solder Bridge" 4148.9,525 r0 top
SB55 "Solder Bridge 0603" "Solder Bridge" 4148.9,580 r0 top
SB56 "Solder Bridge 0603" "Solder Bridge" 4148.9,469.64 r180 top
SB61 "Solder Bridge 3 Pin" "Solder Bridge 3 Pin" 2245.93,751.97 r270 top
SB62 "Solder Bridge 0603" "Solder Bridge" 2196.96,121 r0 top
SB63 "Solder Bridge 0603" "Solder Bridge" 2205.41,469.64 r180 top
SB64 "Solder Bridge 0603" "Solder Bridge" 2205.41,525 r0 top
SB65 "Solder Bridge 0603" "Solder Bridge" 2205.41,580 r0 top
SB71 "Solder Bridge 3 Pin" "Solder Bridge 3 Pin" 1146.15,751.97 r270 top
SB72 "Solder Bridge 0603" "Solder Bridge" 1097.18,121 r0 top
SB73 "Solder Bridge 0603" "Solder Bridge" 1105.63,469.64 r180 top
SB74 "Solder Bridge 0603" "Solder Bridge" 1105.63,525 r0 top
SB75 "Solder Bridge 0603" "Solder Bridge" 1105.63,580 r0 top
SB81 "Solder Bridge 3 Pin" "Solder Bridge 3 Pin" 577.17,751.97 r270 top
SB82 "Solder Bridge 0603" "Solder Bridge" 528.2,121 r0 top
SB83 "Solder Bridge 0603" "Solder Bridge" 536.65,469.64 r180 top
SB84 "Solder Bridge 0603" "Solder Bridge" 536.65,525 r0 top
SB85 "Solder Bridge 0603" "Solder Bridge" 536.65,580 r0 top
SB91 "Solder Bridge 0402" "Solder Bridge 0402" 4746.02,6038.62 r90 top
SB92 "Solder Bridge 0402" "Solder Bridge 0402" 4677.28,6038.62 r90 top
SB93 "Solder Bridge 0402" "Solder Bridge 0402" 4608.54,6038.62 r90 top
SB94 "Solder Bridge 0402" "Solder Bridge 0402" 4539.8,6038.62 r90 top
SB95 "Solder Bridge 0402" "Solder Bridge 0402" 4471.06,6038.62 r90 top
SB96 "Solder Bridge 0402" "Solder Bridge 0402" 4402.32,6038.62 r90 top
SB97 "Solder Bridge 0402" "Solder Bridge 0402" 4333.58,6038.62 r90 top
SB98 "Solder Bridge 0402" "Solder Bridge 0402" 4264.84,6038.62 r90 top
SB101 "Solder Bridge 0402" "Solder Bridge 0402" 4666.06,5228.35 r270 top
SB102 "Solder Bridge 0402" "Solder Bridge 0402" 4624.92,5228.35 r270 top
SB103 "Solder Bridge 0402" "Solder Bridge 0402" 4583.78,5228.35 r270 top
SB104 "Solder Bridge 0402" "Solder Bridge 0402" 4542.64,5228.35 r270 top
SB105 "Solder Bridge 0402" "Solder Bridge 0402" 4501.49,5228.35 r270 top
SB106 "Solder Bridge 0402" "Solder Bridge 0402" 4460.35,5228.35 r270 top
SB107 "Solder Bridge 0402" "Solder Bridge 0402" 4419.21,5228.35 r270 top
SB108 "Solder Bridge 0402" "Solder Bridge 0402" 4378.06,5228.35 r270 top
SW1 "TC-0522C-1.7-260G" TC-0522C-1.7-260G_ 4001.82,6154.07 r90 top value=-
SW2 "TC-0522C-1.7-260G" TC-0522C-1.7-260G_ 4001.82,5847.07 r90 top value=-
U1 "TLV76150DCYR" "SOT- 223" 4965.45,6058.07 r180 top
U2 "TL074HIPWR" TSSOP-14 8536,235.17 r270 top
U3 "LM324DT" 14-SO 4787,5653.82 r0 top
U4 "LM324DT" 14-SO 4287.98,5653.82 r0 top
U5 "TL074HIPWR" TSSOP-14 7866.52,235.17 r270 top
U6 "TL074HIPWR" TSSOP-14 7129.78,235.17 r270 top
U7 "TL074HIPWR" TSSOP-14 6317.06,235.17 r270 top
U8 "TL074HIPWR" TSSOP-14 4354.9,235.17 r270 top
U9 "TL074HIPWR" TSSOP-14 2411.41,235.17 r270 top
U10 "TL074HIPWR" TSSOP-14 1311.63,235.17 r270 top
U11 "TL074HIPWR" TSSOP-14 742.65,235.17 r270 top

## Footprints (in the part's own frame and the unit in brackets; to place one, negate y for a bottom-side part, rotate by r counter-clockwise, add the part's x,y. Pads: shape width x height; smd on the part's side, far side on the other; paste and mask are expansions set on the pad)
"4 Pin SMD Wire CON." [mm]
  oct 1.5x1.5 smd: 1(0,0) 2(2.54,0) 3(5.08,0) 4(7.62,0)
  silkscreen extent -0.98,-0.97 8.6,0.97
8.01A0.015200 [mm]
  rect 0.25x1.3 smd paste+0 mask+0.05: 1(3.5,1.54) 2(3,1.54) 3(2.5,1.54) 4(2,1.54) 5(1.5,1.54) 6(1,1.54) 7(0.5,1.54) 8(0,1.54) 9(-0.5,1.54) 10(-1,1.54) 11(-1.5,1.54) 12(-2,1.54) 13(-2.5,1.54) 14(-3,1.54) 15(-3.5,1.54)
  rect 1.6x2.8 smd paste+0 mask+0.05: MP1(-5.5,-1.54) MP2(5.5,-1.54)
  silkscreen extent -5.55,-3.31 5.55,1.86, body extent -5.8,-3.58 5.8,2.32, height 2.02
14-SO [mil]
  rect 80.24x22.6 smd: 1(-109.02,150) 2(-109.02,100) 3(-109.02,50) 4(-109.02,0) 5(-109.02,-50) 6(-109.02,-100) 7(-109.02,-150) 8(109.02,-150) 9(109.02,-100) 10(109.02,-50) 11(109.02,0) 12(109.02,50) 13(109.02,100) 14(109.02,150)
  silkscreen extent -164,-173 60,173, body extent -118,-170 118,170, height 69
cap-0402 [mil]
  rect 18x25 smd mask+2.36: 1(-18.5,0) 2(18.5,0)
  silkscreen extent -31,-16 31,16, body extent -20,-10 20,10, height 19
Cap-0402 [mil]
  rect 18x25 smd mask+2.36: 1(-18.5,0) 2(18.5,0)
  silkscreen extent -31,-16 31,16, body extent -20,-10 20,10, height 19
Cap-0603 [mil]
  rect 30x35 smd mask+2.36: 1(-30,0) 2(30,0)
  silkscreen extent -49,-21 49,21, body extent -32,-16 31,16, height 34
Cap-0805 [mil] "SMD 0805"
  rect 40x60 smd mask+2.76: 1(-40,0) 2(40,0)
  silkscreen extent -64,-34 64,34, body extent -39,-25 39,25, height 30
"EMG ELECTRODE 4 pin" [mm]
  round 10 smd: 1(0,-19.974) 2(0,0) 3(0,20.026)
  oval 10.5x4.2 smd: 4(0,-10)
  silkscreen extent -5.68,-25.2 5.68,25.25
Res-0402 [mil]
  rect 18x25 smd mask+2.17: 1(-18.5,0) 2(18.5,0)
  silkscreen extent -32,-17 32,16, body extent -23,-11 23,11, height 16
Res-0603 [mil]
  rect 30x35 smd: 1(-30,0) 2(30,0)
  silkscreen extent -48,-21 48,21, body extent -31,-17 31,17, height 18
SEMG-PAD [mm]
  round 10 smd: 1(0,9.987) 2(0,-9.987)
  oval 10.5x4.2 smd: 3(0,-0.013)
  silkscreen extent -5.68,-15.21 5.68,15.21
SOD323F [mm]
  rect 0.6x0.6 smd: 1(-1.05,0) 2(1.05,0)
  silkscreen extent -0.91,-0.79 2.11,0.79, body extent -1.25,-0.68 1.25,0.68, height 1
"Solder Bridge" [mil] "Solder Bridge ON"
  rect 30x35 smd: 1(-30,0) 2(30,0)
  silkscreen extent -50,-22 50,22
"Solder Bridge 3 Pin" [mil]
  rrect50% 30x35 smd: 1(-60,0) 3(60,0)
  rect 30x35 smd: 2(0,0)
  silkscreen extent -81,-24 81,24
"Solder Bridge 0402" [mil]
  rect 18x25 smd mask+2.17: 1(-18.5,0) 2(18.5,0)
  silkscreen extent -32,-17 32,16
"SOT- 223" [mm]
  rect 1.5x2 smd: 1(-2.3,-3.05) 2(0,-3.05) 3(2.3,-3.05)
  rect 3.8x2 smd: 4(0,3.05)
  silkscreen extent -3.35,-3.2 3.3,1.8, body extent -3.25,-3.5 3.25,3.5, height 1.61
TC-0522C-1.7-260G_ [mm]
  rect 1x0.6 smd: 1(-3,1.85) 2(3,1.85) 3(3,-1.85) 4(-3,-1.85)
  silkscreen extent -3.15,-2.67 2.72,2.67, body extent -3.2,-2.6 3.2,2.6, height 1.7
"Test Pad (SMD 3 Pin)" [mm]
  rrect50% 2x2 smd: 1(0,2.54) 3(0,-2.54)
  oval 4x2 smd: 2(0,0)
TSSOP-14 [mm]
  rect 1.5x0.45 smd: 1(-2.9,1.95) 2(-2.9,1.3) 3(-2.9,0.65) 4(-2.9,0) 5(-2.9,-0.65) 6(-2.9,-1.3) 7(-2.9,-1.95) 8(2.9,-1.95) 9(2.9,-1.3) 10(2.9,-0.65) 11(2.9,0) 12(2.9,0.65) 13(2.9,1.3) 14(2.9,1.95)
  silkscreen extent -4.01,-2.54 2.29,2.54, body extent -3.2,-2.5 3.2,2.5, height 1.2

## Part data
C1 C3: library part CL21B475KAFNNNE, "CAP CER 4.7UF 25V X7R 0805", Case Code (Imperial)=0805, Case Code (Metric)=2012, LCSC Part Number=C98195, Manufacturer=Samsung, Max Operating Temperature=125°C, Min Operating Temperature=-55°C, Tolerance=10%, Voltage Rating=25V, Case/Package=0805, ComponentLink1Description=https://datasheet.ciiva.com/25711/cl21b475kafnnne-25711752.pdf?src-supplier=Digikey, ComponentLink1URL=https://datasheet.ciiva.com/25711/cl21b475kafnnne-25711752.pdf?src-supplier=Digikey, Height=1.45mm, Item Type=Capacitors, Lead Free="Lead Free", Length=0.079inch, Manufacturer Part Number=CL21B475KAFNNNE, Material=4241ConductorMaterial, Mounting Technology="Surface Mount", Packaging="Cut Tape", Pricing="1=0.4, 10=0.246, 100=0.1664, 1000=0.1216 (USD)", RoHS=Yes, RoHS Compliant=Yes, Series=CL, Stock=74766, Supplier=Digikey, Thickness=0.053inch, Voltage Rating (DC)=25V, Width=0.049inch
C2 C4 C5 C16 C24 C32 C40 C48 C56 C64: library part C1005X7R1H104KT000F, "CAP CER 0.1UF 50V X7R 0402", Dielectric=X7R, LCSC Part Number=C361198, Manufacturer=TDK, Tolerance=10%, Voltage=25V, Category="Ceramic Capacitors", ComponentLink1Description=LCSC, ComponentLink1URL=https://www.lcsc.com/product-detail/Multilayer-Ceramic-Capacitors-MLCC-SMD-SMT_TDK-C1005X7R1H104KT000F_C361198.html, Item Type=Capacitor, Manufacturer Part Number=C1005X7R1H104KT000F, RoHS=No, Supplier 1=Avnet, Supplier Part Number 1=C1005X7R1H104KT000F
C6 C17 C25 C33 C41 C49 C57 C65: library part C1608X5R1E475KT000E, "CAP CER, 4.7 µF, 25 V, 0603", Case Code (Imperial)=0603, Case Code (Metric)=1608, Dielectric=X5R, Dielectric Material=Ceramic, LCSC Part Number=C76615, Manufacturer=TDK, Max Operating Temperature=85°C, Min Operating Temperature=-55°C, Package Quantity=4000, Supplier Part Number 1=2220Y1000562GCT-ND, Tolerance=10%, Voltage Rating=25V, Capacitance=4.7uF, Case/Package=0603, Category="Ceramic Capacitors", ComponentLink1Description=https://datasheet.ciiva.com/48587/6print-detail-pdf-phplangenpart-noc1608x5r1e475k080acimp-unit-xmhz-48587141.pdf?src-supplier=Onlinecomponents.com, ComponentLink1URL=https://datasheet.ciiva.com/48587/6print-detail-pdf-phplangenpart-noc1608x5r1e475k080acimp-unit-xmhz-48587141.pdf?src-supplier=Onlinecomponents.com, ComponentLink2Description=https://datasheet.ciiva.com/24216/mlcc-commercial-general-en-24216326.pdf?src-supplier=Mouser, ComponentLink2URL=https://datasheet.ciiva.com/24216/mlcc-commercial-general-en-24216326.pdf?src-supplier=Mouser, ComponentLink3Description=https://datasheet.ciiva.com/48671/mlcc-commercial-general-en-48671304.pdf?src-supplier=Avnet, ComponentLink3URL=https://datasheet.ciiva.com/48671/mlcc-commercial-general-en-48671304.pdf?src-supplier=Avnet, Depth=0.8mm, Height=0.8mm, Item Type=Capacitor, Lead Free="Lead Free", Length=1.6mm, Manufacturer Part Number=C1608X5R1E475KT000E, Mount="Surface Mount", Packaging="Tape and Reel", Pricing 2="100=0.23400, 200=0.21900, 1000=0.20700, 2000=0.18700 (GBP)", REACH SVHC="No SVHC", Resistor Type=Ceramic, RoHS=No, Stock 2=16120, Supplier 1=Digi-Key, Supplier 2=RSComponents, Supplier Part Number 2=9159158P, Termination=SMD/SMT, Thickness=0.039inch, Voltage Rating (DC)=25V, Weight=7.1E-05oz, Width=0.031inch
C7 C18 C26 C34 C42 C50 C58 C66: library part CC0603KRX7R9BB222, "CAP CER 2200PF 50V X7R 0603", Case Code (Imperial)=0603, Case Code (Metric)=1608, Dielectric=X7R, Insulation Resistance=10GR, LCSC Part Number=C107082, Manufacturer=Yageo, Max Operating Temperature=125°C, Min Operating Temperature=-55°C, Package Quantity=1, Resistor Type=Ceramic, Supplier Part Number 1=6169509, Tolerance=10%, Voltage=50V, Capacitance=2.2nF, Case/Package=0603, Category="Ceramic Capacitors", ComponentLink1Description=https://datasheet.ciiva.com/23768/1079489-23768004.pdf?src-supplier=Newark, ComponentLink1URL=https://datasheet.ciiva.com/23768/1079489-23768004.pdf?src-supplier=Newark, ComponentLink2Description=https://datasheet.ciiva.com/11788/0900766b8079c870-11788403.pdf?src-supplier=RSComponents, ComponentLink2URL=https://datasheet.ciiva.com/11788/0900766b8079c870-11788403.pdf?src-supplier=RSComponents, ComponentLink3Description=https://datasheet.ciiva.com/26862/getdatasheetpartid-403587-26862854.pdf?src-supplier=Verical, ComponentLink3URL=https://datasheet.ciiva.com/26862/getdatasheetpartid-403587-26862854.pdf?src-supplier=Verical, ComponentLink4Description=https://datasheet.ciiva.com/8033/70765-8033863.pdf?src-supplier=Element14, ComponentLink4URL=https://datasheet.ciiva.com/8033/70765-8033863.pdf?src-supplier=Element14, ComponentLink5Description=https://datasheet.ciiva.com/7978/1489800-7978172.pdf?src-supplier=Element14, ComponentLink5URL=https://datasheet.ciiva.com/7978/1489800-7978172.pdf?src-supplier=Element14, ComponentLink6Description=https://datasheet.ciiva.com/28450/1489800-28450632.pdf?src-supplier=Element14, ComponentLink6URL=https://datasheet.ciiva.com/28450/1489800-28450632.pdf?src-supplier=Element14, ComponentLink7Description=https://datasheet.ciiva.com/155/mlccorderingcode-155921.pdf?src-supplier=Digi-Key, ComponentLink7URL=https://datasheet.ciiva.com/155/mlccorderingcode-155921.pdf?src-supplier=Digi-Key, ComponentLink8Description=https://datasheet.ciiva.com/155/mlccorderingcode-155920.pdf?src-supplier=Digi-Key, ComponentLink8URL=https://datasheet.ciiva.com/155/mlccorderingcode-155920.pdf?src-supplier=Digi-Key, ComponentLink9Description=https://datasheet.ciiva.com/155/mlccorderingcode-155922.pdf?src-supplier=Digi-Key, ComponentLink9URL=https://datasheet.ciiva.com/155/mlccorderingcode-155922.pdf?src-supplier=Digi-Key, ComponentLink10Description=https://datasheet.ciiva.com/8033/1489800-8033864.pdf?src-supplier=Element14, ComponentLink10URL=https://datasheet.ciiva.com/8033/1489800-8033864.pdf?src-supplier=Element14, ComponentLink11Description=https://datasheet.ciiva.com/8033/1489800-8033862.pdf?src-supplier=Element14, ComponentLink11URL=https://datasheet.ciiva.com/8033/1489800-8033862.pdf?src-supplier=Element14, ComponentLink12Description=https://datasheet.ciiva.com/16625/upy-gphc-x7r-6-3v-to-50v-8-16625531.pdf?src-supplier=Avnet+Europe, ComponentLink12URL=https://datasheet.ciiva.com/16625/upy-gphc-x7r-6-3v-to-50v-8-16625531.pdf?src-supplier=Avnet+Europe, Depth=0.8mm, Dissipation Factor=2.5%, Halogen Free="Halogen Free", Height=0.8mm, Item Type=Capacitor, Lead Free="Lead Free", Length=1.6mm, Manufacturer Part Number=CC0603KRX7R9BB222, Mount="Surface Mount", Number of Pins=2, Packaging="Tape and Reel", Pricing 1="4000=0.00500 (USD)", Radiation Hardening=No, REACH SVHC="No SVHC", RoHS=Yes, RoHS Compliant=Yes, Series=CC, Stock 1=1, Supplier 1=RSComponents, Termination=SMD/SMT, Thickness=0.035inch, Voltage Rating=50V, Voltage Rating (DC)=50V, Width=0.031inch
C8 C9 C19 C20 C27 C28 C35 C36 C43 C44 C51 C52 C59 C60 C67 C68: library part CGA3E2X8R1H473M080AA, "CAP CER 0.047UF 50V X8R 0603", Case Code (Imperial)=0603, Case Code (Metric)=1608, Dielectric=X8R, LCSC Part Number=C2172709, Manufacturer=TDK, Max Operating Temperature=150°C, Min Operating Temperature=-55°C, Package Quantity=4000, Ratings=AEC-Q200, Supplier Part Number 1=445-12603-1-ND, Tolerance=20%, Voltage Rating=50V, Capacitance=47nF, Case/Package=0603, Category="Ceramic Capacitors", ComponentLink1Description=http://www.mouser.com/ds/2/400/mlcc_automotive_hightemp_en-520039.pdf?src-supplier=Mouser, ComponentLink1URL=http://www.mouser.com/ds/2/400/mlcc_automotive_hightemp_en-520039.pdf?src-supplier=Mouser, ComponentLink2Description=https://product.tdk.com/info/en/catalog/spec/mlccspec_automotive_hightemp_en.pdf?src-supplier=Digi-Key, ComponentLink2URL=https://product.tdk.com/info/en/catalog/spec/mlccspec_automotive_hightemp_en.pdf?src-supplier=Digi-Key, ComponentLink3Description=http://product.tdk.com/en/catalog/datasheets/mlcc_automotive_hightemp_en.pdf?src-supplier=Avnet, ComponentLink3URL=http://product.tdk.com/en/catalog/datasheets/mlcc_automotive_hightemp_en.pdf?src-supplier=Avnet, Features="High Temperature", Height=0.8mm, Item Type=Capacitor, Length=0.063inch, Manufacturer Part Number=CGA3E2X8R1H473M080AA, Mount="Surface Mount", Packaging="Tape and Reel", Pricing 1="1=0.16000, 10=0.11200, 50=0.06360, 100=0.05260, 500=0.03690, 1000=0.03055 (USD)", RoHS=Yes, Stock 1=1279, Supplier 1=Digi-Key, Thickness=0.035inch, Voltage Rating (DC)=50V, Weight=7.1E-05oz, Width=0.031inch
C10 C21 C29 C37 C45 C53 C61 C69: library part CC0603JRX7R9BB104, "Optional"
C11 C22 C30 C38 C46 C54 C62 C70: library part GRM21BR61A476ME15L, "CAP CER 47UF 10V X5R 0805", Case Code (Imperial)=0805, Case Code (Metric)=2012, Dielectric=X5R, Dielectric Material=Ceramic, LCSC Part Number=C124129, Manufacturer=Murata, Max Operating Temperature=85°C, Min Operating Temperature=-55°C, Tolerance=20%, Voltage=10V, Case/Package=0805, ComponentLink1Description=http://www.farnell.com/datasheets/2079183.pdf?src-supplier=Farnell, ComponentLink1URL=http://www.farnell.com/datasheets/2079183.pdf?src-supplier=Farnell, ComponentLink2Description=http://www.farnell.com/datasheets/2079183.pdf?src-supplier=Newark, ComponentLink2URL=http://www.farnell.com/datasheets/2079183.pdf?src-supplier=Newark, ComponentLink3Description=http://www.farnell.com/datasheets/2079183.pdf?src-supplier=Element14, ComponentLink3URL=http://www.farnell.com/datasheets/2079183.pdf?src-supplier=Element14, ComponentLink4Description=https://datasheet.octopart.com/GRM21BR61A476ME15L-Murata-datasheet-66077109.pdf?src-supplier=Element14, ComponentLink4URL=https://datasheet.octopart.com/GRM21BR61A476ME15L-Murata-datasheet-66077109.pdf?src-supplier=Element14, ComponentLink5Description=http://search.murata.co.jp/Ceramy/image/img/A01X/G101/ENG/GRM21BR61A476ME15-01.pdf?src-supplier=Digikey, ComponentLink5URL=http://search.murata.co.jp/Ceramy/image/img/A01X/G101/ENG/GRM21BR61A476ME15-01.pdf?src-supplier=Digikey, ComponentLink6Description=https://search.murata.co.jp/Ceramy/image/img/A01X/G101/ENG/GRM21BR61A476ME15-01.pdf?src-supplier=Digikey, ComponentLink6URL=https://search.murata.co.jp/Ceramy/image/img/A01X/G101/ENG/GRM21BR61A476ME15-01.pdf?src-supplier=Digikey, ComponentLink7Description=http://psearch.en.murata.com/capacitor/product/GRM21BR61A476ME15%23.pdf?src-supplier=Avnet, ComponentLink7URL=http://psearch.en.murata.com/capacitor/product/GRM21BR61A476ME15%23.pdf?src-supplier=Avnet, Depth=1.25mm, Dissipation Factor=0.035%, Height=1.25mm, Item Type=Capacitors, Lead Free="Lead Free", Length=0.079inch, Manufacturer Part Number=GRM21BR61A476ME15L, Material=4241ConductorMaterial, Mounting Technology="Surface Mount", Packaging="Cut Tape", Pricing="3000=0.161, 6000=0.157, 9000=0.156, 12000=0.154, 15000=0.15 (USD)", Reach SVHC Compliant=No, RoHS=Yes, RoHS Compliant=Yes, Series=GRM, Stock=315000, Supplier="Future Electronics", Termination=SMD/SMT, Thickness=0.057inch, Voltage Rating=10V, Voltage Rating (DC)=10V, Width=0.049inch
C12 C23 C31 C39 C47 C55 C63 C71: library part CC0603KRX7R8BB224, "CAP CER 0.22UF 25V X7R 0603", LCSC Part Number=C106857, Manufacturer=Yageo, ComponentLink1Description=http://www.mouser.com/ds/2/447/Yageo_UPY-GP_NP0_16V-to-50V_9-358835.pdf?src-supplier=Mouser, ComponentLink1URL=http://www.mouser.com/ds/2/447/Yageo_UPY-GP_NP0_16V-to-50V_9-358835.pdf?src-supplier=Mouser, ComponentLink2Description=https://datasheet.octopart.com/CC0603KRX7R8BB224-Yageo-datasheet-140260305.pdf?src-supplier=Newark, ComponentLink2URL=https://datasheet.octopart.com/CC0603KRX7R8BB224-Yageo-datasheet-140260305.pdf?src-supplier=Newark, ComponentLink3Description=https://datasheet.octopart.com/CC0603KRX7R8BB224-Yageo-datasheet-181968713.pdf?src-supplier=Element14, ComponentLink3URL=https://datasheet.octopart.com/CC0603KRX7R8BB224-Yageo-datasheet-181968713.pdf?src-supplier=Element14, ComponentLink4Description=https://datasheet.octopart.com/CC0603KRX7R8BB224-Yageo-datasheet-181968713.pdf?src-supplier=Newark, ComponentLink4URL=https://datasheet.octopart.com/CC0603KRX7R8BB224-Yageo-datasheet-181968713.pdf?src-supplier=Newark, ComponentLink5Description=https://datasheet.octopart.com/CC0603KRX7R8BB224-Yageo-datasheet-147453679.pdf?src-supplier=Farnell, ComponentLink5URL=https://datasheet.octopart.com/CC0603KRX7R8BB224-Yageo-datasheet-147453679.pdf?src-supplier=Farnell, ComponentLink6Description=https://datasheet.octopart.com/CC0603KRX7R8BB224-Yageo-datasheet-27626582.pdf?src-supplier=Future+Electronics, ComponentLink6URL=https://datasheet.octopart.com/CC0603KRX7R8BB224-Yageo-datasheet-27626582.pdf?src-supplier=Future+Electronics, ComponentLink7Description=http://www.yageo.com/documents/recent/UPY-GPHC_X7R_6.3V-to-50V_8.pdf?src-supplier=Avnet, ComponentLink7URL=http://www.yageo.com/documents/recent/UPY-GPHC_X7R_6.3V-to-50V_8.pdf?src-supplier=Avnet, ComponentLink8Description=http://www.yageo.com/documents/recent/UPY-GPHC_X7R_6.3V-to-50V_18.pdf?src-supplier=Digikey, ComponentLink8URL=http://www.yageo.com/documents/recent/UPY-GPHC_X7R_6.3V-to-50V_18.pdf?src-supplier=Digikey, ComponentLink9Description=https://datasheet.octopart.com/CC0603KRX7R8BB224-Yageo-datasheet-151948686.pdf?src-supplier=TME, ComponentLink9URL=https://datasheet.octopart.com/CC0603KRX7R8BB224-Yageo-datasheet-151948686.pdf?src-supplier=TME, Halogen Free=5694HalogenFree, Item Type=Capacitors, Lead Free=5697LeadFree, Manufacturer Part Number=CC0603KRX7R8BB224, Material=4241ConductorMaterial, Pins=2NUMBER, Pricing="1=0.13, 10=0.07, 50=0.0488, 100=0.0422, 500=0.03094, 1000=0.02743 (USD)", RoHS=Yes, Stock=76385, Supplier=Digikey
C13: library part CL10A106MA8NRNC, "CAP CER 10UF 25V X5R 0603", Case Code (Imperial)=0603, Case Code (Metric)=1608, Dielectric=X5R, LCSC Part Number=C96446, Manufacturer=Samsung, Max Operating Temperature=85°C, Min Operating Temperature=-55°C, Package Quantity=1, Tolerance=20%, Voltage Rating=25V, Capacitance=10uF, Case/Package=0603, Category="Ceramic Capacitors", ComponentLink1Description=https://datasheet.ciiva.com/25766/cl10a106ma8nrnc-25766562.pdf?src-supplier=Digi-Key, ComponentLink1URL=https://datasheet.ciiva.com/25766/cl10a106ma8nrnc-25766562.pdf?src-supplier=Digi-Key, Construction=Flat, Contact Plating=Tin, Lead Free="Lead Free", Length=0.063inch, Manufacturer Part Number=CL10A106MA8NRNC, Mount="Surface Mount", Packaging="Tape and Reel", Pricing 1="4000=0.03753, 8000=0.03700, 16000=0.03595, 24000=0.03515, 32000=0.03383, 40000=0.03304, 400000=0.03225 (USD)", RoHS=Yes, RoHS Compliant=Yes, Series=CL, Supplier 1=Avnet, Supplier Part Number 1=CL10A106MA8NRNC, Termination=Wraparound, Thickness=0.035inch, Width=0.031inch
C14 C15: library part GRM155R71H104ME14D, "CAP CER 0.1UF 50V X7R 0402", Capacitance=100nF, Case/Package=0402, LCSC Part Number=C182412, Manufacturer=Murata, Max Operating Temperature=125°C, Min Operating Temperature=-55°C, Tolerance=20%, Voltage Rating=50V, Category="Ceramic Capacitors", ComponentLink1Description=http://www.mouser.com/ds/2/281/c02e-2905.pdf?src-supplier=Mouser, ComponentLink1URL=http://www.mouser.com/ds/2/281/c02e-2905.pdf?src-supplier=Mouser, ComponentLink2Description=http://search.murata.co.jp/Ceramy/image/img/A01X/G101/ENG/GRM155R71H104ME14-01.pdf?src-supplier=Digi-Key, ComponentLink2URL=http://search.murata.co.jp/Ceramy/image/img/A01X/G101/ENG/GRM155R71H104ME14-01.pdf?src-supplier=Digi-Key, ComponentLink3Description=http://psearch.en.murata.com/capacitor/product/GRM155R71H104ME14%23.pdf?src-supplier=Avnet, ComponentLink3URL=http://psearch.en.murata.com/capacitor/product/GRM155R71H104ME14%23.pdf?src-supplier=Avnet, Item Type=Capacitor, Length=0.039inch, Manufacturer Part Number=GRM155R71H104ME14D, Mount="Surface Mount", Packaging="Cut Tape", Pricing 1="10000=0.00444, 20000=0.00420, 40000=0.00396, 60000=0.00372, 80000=0.00348, 100000=0.00324, 1000000=0.00300 (USD)", RoHS=Yes, RoHS Compliant=Yes, Stock 1=100000, Supplier 1=Avnet, Supplier Part Number 1=GRM155R71H104ME14D, Thickness=0.022inch, Width=0.02inch
D1 D2 D3 D4 D5 D6 D7 D8: "DIODE ZENER 3.3V 200MW SOD323F", Forward Voltage=1V, LCSC Part Number=C2978865, Manufacturer="ON Semiconductor / Fairchild", Max Operating Temperature=150°C, Max Power Dissipation=200mW, Max Reverse Leakage Current=4.5uA, Min Operating Temperature=-65°C, Package Quantity=1, Supplier Part Number 1=MM3Z3V3BCT-ND, Test Current=5mA, Tolerance=2%, Working Voltage=3.3V, ComponentLink1Description=http://www.onsemi.com/pub/Collateral/MM3Z9V1B-D.pdf?src-supplier=Digi-Key, ComponentLink1URL=http://www.onsemi.com/pub/Collateral/MM3Z9V1B-D.pdf?src-supplier=Digi-Key, ComponentLink2Description=http://www.mouser.com/ds/2/149/MM3Z3V3B-187166.pdf?src-supplier=Mouser, ComponentLink2URL=http://www.mouser.com/ds/2/149/MM3Z3V3B-187166.pdf?src-supplier=Mouser, ComponentLink3Description=https://www.fairchildsemi.com/datasheets/MM/MM3Z9V1B.pdf?src-supplier=Avnet, ComponentLink3URL=https://www.fairchildsemi.com/datasheets/MM/MM3Z9V1B.pdf?src-supplier=Avnet, ComponentLink4Description=http://www.farnell.com/datasheets/1706525.pdf?src-supplier=Element14, ComponentLink4URL=http://www.farnell.com/datasheets/1706525.pdf?src-supplier=Element14, Element Configuration=Single, Height=1mm, Impedance=89R, Item Type=Diode, Lead Free="Lead Free", Length=1.3mm, Manufacturer Part Number=MM3Z3V3B, Mount="Surface Mount", Number of Pins=2, Packaging="Tape and Reel", Peak Reverse Current=4.5uA, Power Dissipation=200mW, Pricing 1="1=0.22, 10=0.18, 100=0.0956, 500=0.06288, 1000=0.04276 (USD)", Radiation Hardening=No, REACH SVHC="No SVHC", Stock 1=473644, Supplier 1=Digi-Key, Voltage Tolerance=2%, Weight=0.0276g, Width=1.7mm, Zener Voltage=3.3V
J1 J5 J8 J11 J14 J17 J20 J23: "Test Pad"
J2 J6 J9 J12 J15 J18 J21 J24: "Wire Connecting Pads", Item Type="SMD Pads", Manufacturer Part Number="4 Pin SMD Wire Connector"
J3 J7 J10 J13 J16 J19 J22 J25: "Sensor Connecting Pads"
J4: "-40℃~+80℃ 15P Dual-sided contacts / top and bottom connection 0.5mm SMD,P=0.5mm,Surface Mount，Right Angle FFC, FPC (Flat Flexible) Connector Assemblies ROHS", LCSC Part Number=C19188796, Manufacturer=DIANWEI, Package="SMD,P=0.5mm,Surface Mount，Right Angle", ComponentLink1Description=LCSC, ComponentLink1URL=https://www.lcsc.com/product-detail/FFC-FPC-Flat-Flexible-Connector-Assemblies_DIANWEI-8-01A0-015200_C19188796.html?s_z=n_HC-FPC-05-20-15RLTAG, Item Type="FFC, FPC Connector", Manufacturer Part Number=8.01A0.015200
R1 R9 R24 R32 R37 R45 R50 R58 R63 R71 R76 R84 R89 R97 R102 R110: library part RC0603FR-071KL, "Optional"
R2 R7 R10 R12 R14 R15 R16 R18 R19 R20 R22 R23 R25 R30 R33 R35 R38 R43 R46 R48 R51 R56 R59 R61 R64 R69 R72 R74 R77 R82 R85 R87 R90 R95 R98 R100 R103 R108 R111 R113: library part RC0402FR-071KL, "RES 1K OHM 1% 1/16W 0402", Case Code (Imperial)=0402, Case Code (Metric)=1005, LCSC Part Number=C106235, Manufacturer=Yageo, Max Operating Temperature=155°C, Max Power Dissipation=63mW, Min Operating Temperature=-55°C, Power Rating=62.5mW, Resistance=1kR, Resistance Tolerance=1%, Resistor Type="Thick Film", Temperature Coefficient=100ppm/°C, Voltage Rating=50V, Case/Package=0402, Category="Chip SMD Resistors", ComponentLink1Description=https://datasheet.ciiva.com/11819/0900766b80c66297-11819477.pdf?src-supplier=RSComponents, ComponentLink1URL=https://datasheet.ciiva.com/11819/0900766b80c66297-11819477.pdf?src-supplier=RSComponents, ComponentLink2Description=https://datasheet.ciiva.com/7983/1018594-7983502.pdf?src-supplier=Element14, ComponentLink2URL=https://datasheet.ciiva.com/7983/1018594-7983502.pdf?src-supplier=Element14, ComponentLink3Description=https://datasheet.ciiva.com/22747/1018594-22747513.pdf?src-supplier=Element14, ComponentLink3URL=https://datasheet.ciiva.com/22747/1018594-22747513.pdf?src-supplier=Element14, ComponentLink4Description=https://datasheet.ciiva.com/12666/pyu-rc0402-51-rohs-l-6-r-12666741.pdf?src-supplier=Mouser, ComponentLink4URL=https://datasheet.ciiva.com/12666/pyu-rc0402-51-rohs-l-6-r-12666741.pdf?src-supplier=Mouser, ComponentLink5Description=https://datasheet.ciiva.com/7849/1018594-7849869.pdf?src-supplier=Element14, ComponentLink5URL=https://datasheet.ciiva.com/7849/1018594-7849869.pdf?src-supplier=Element14, ComponentLink6Description=https://datasheet.ciiva.com/7849/1018594-7849871.pdf?src-supplier=Element14, ComponentLink6URL=https://datasheet.ciiva.com/7849/1018594-7849871.pdf?src-supplier=Element14, ComponentLink7Description=https://datasheet.ciiva.com/17063/pyu-rc0402-51-rohs-l-6-r-17063193.pdf?src-supplier=Future+Electronics, ComponentLink7URL=https://datasheet.ciiva.com/17063/pyu-rc0402-51-rohs-l-6-r-17063193.pdf?src-supplier=Future+Electronics, Construction=Rectangular, Depth=0.5mm, Features="Moisture Resistant", Height=0.32mm, Item Type=Resistor, Lead Free="Lead Free", Length=1mm, Manufacturer Part Number=RC0402FR-071KL, Military Standard=Not, Number of Pins=2, Number of Terminations=2, Packaging="Tape and Reel", Pricing 1="10000=0.00085, 20000=0.00087, 40000=0.00084, 60000=0.00083, 80000=0.00079, 100000=0.00078, 1000000=0.00076 (USD)", Reach SVHC Compliant=Yes, RoHS=Yes, RoHS Compliant=Yes, Series=RC, Size Code=0402, Stock 1=13030000, Supplier 1=Avnet, Supplier Part Number 1=RC0402FR-071KL, Technology="THICK FILM", Termination=SMD/SMT, Tolerance=1%, Voltage Rating (DC)=50V, Width=0.5mm